# Altium PCB NanoD1.PcbDoc (part 1 of 2)
Units mm, origin at the board's own origin, x right, y up, seen from the top; angles counter-clockwise.
Board outline 66 x 38 mm, 4 copper layers (Top Layer, GND, POWER, Bottom Layer), stack 1.598 mm thick; 143 components, 106 nets, 507 pads, 211 vias.
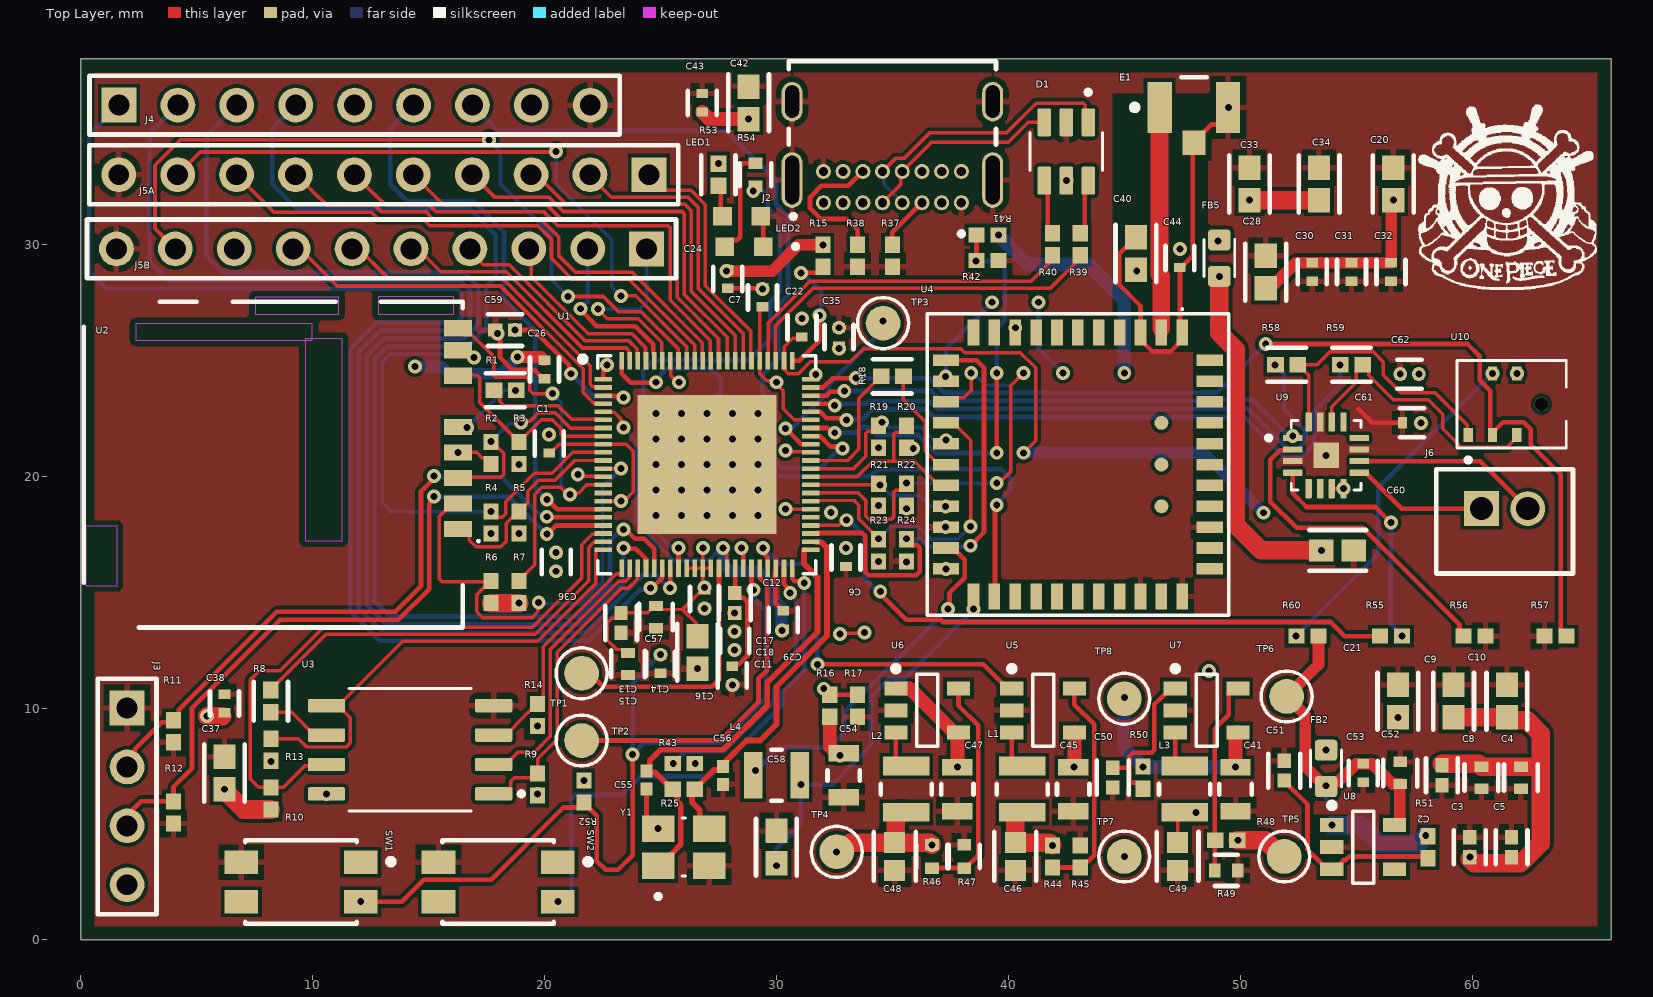
[diagram p0: Top Layer view]
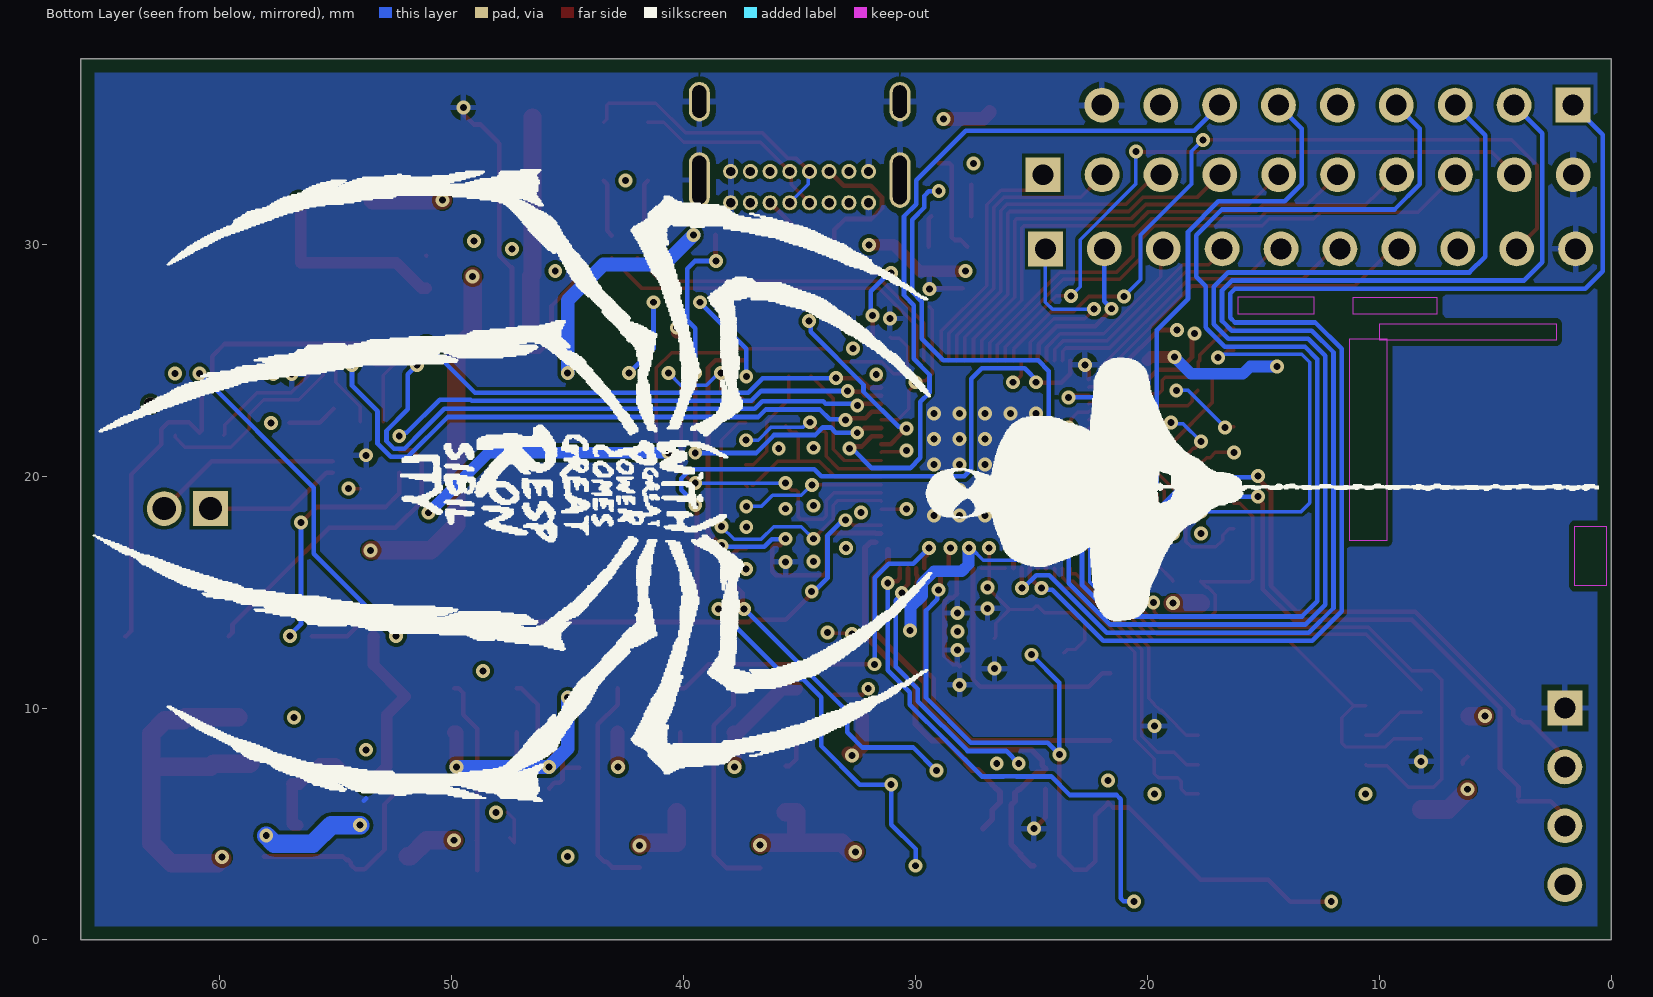
[diagram p1: Bottom Layer view, seen from below]
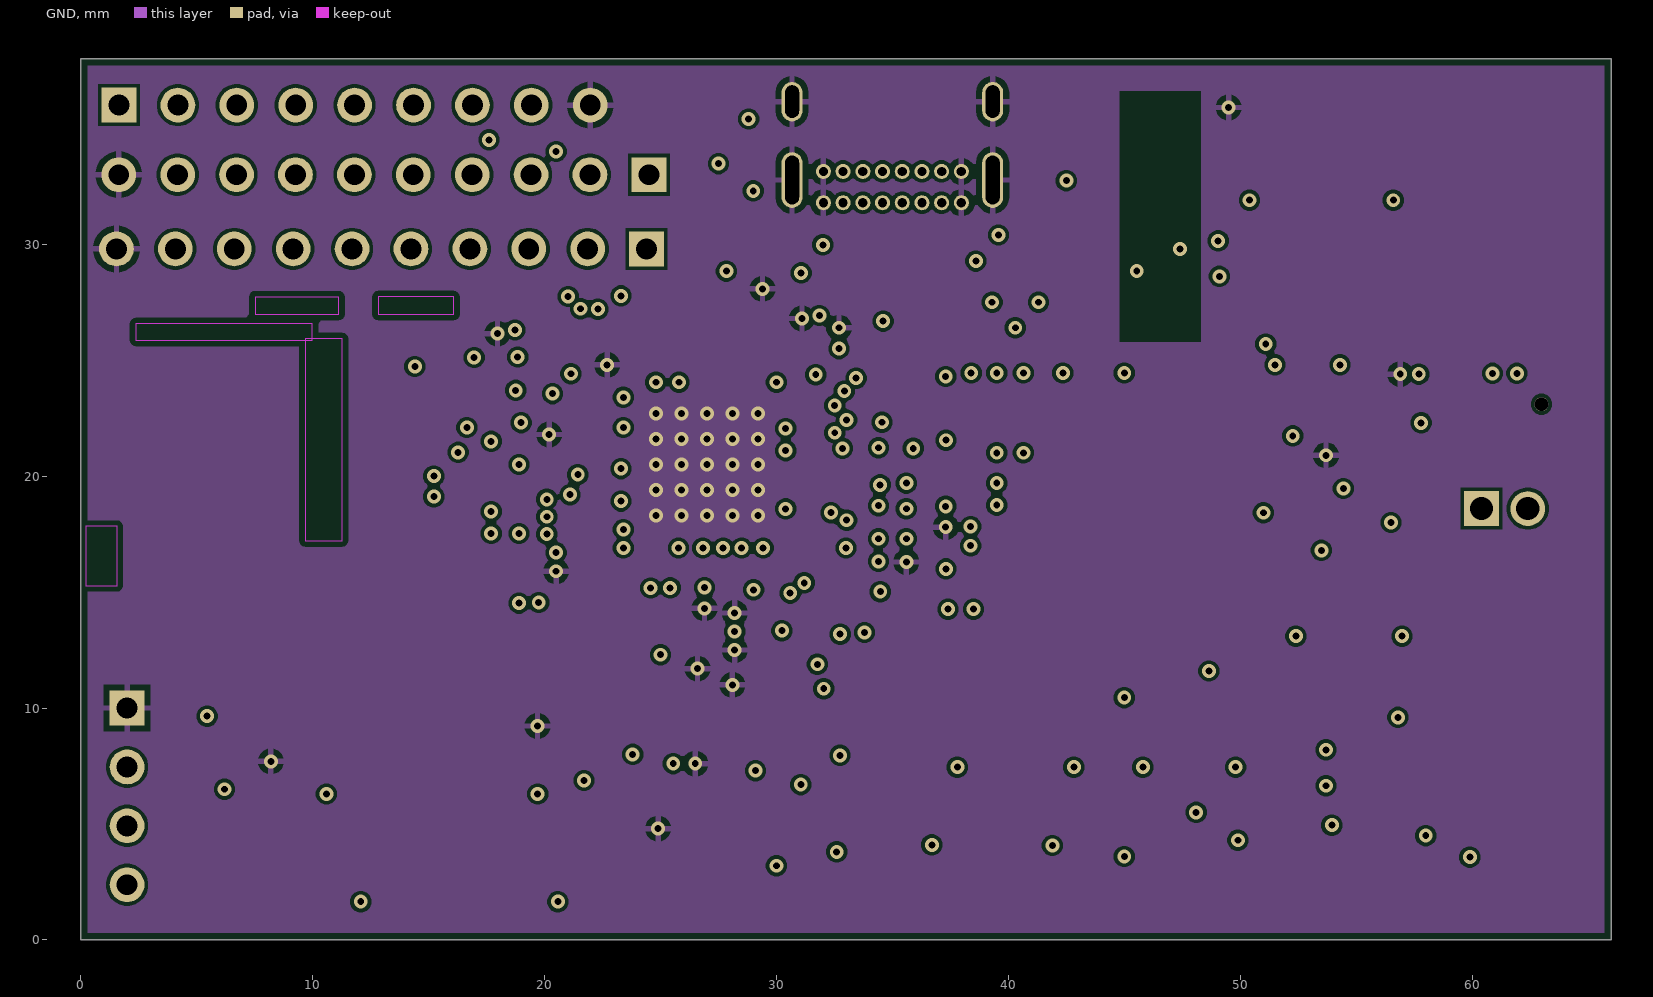
[diagram p2: GND]
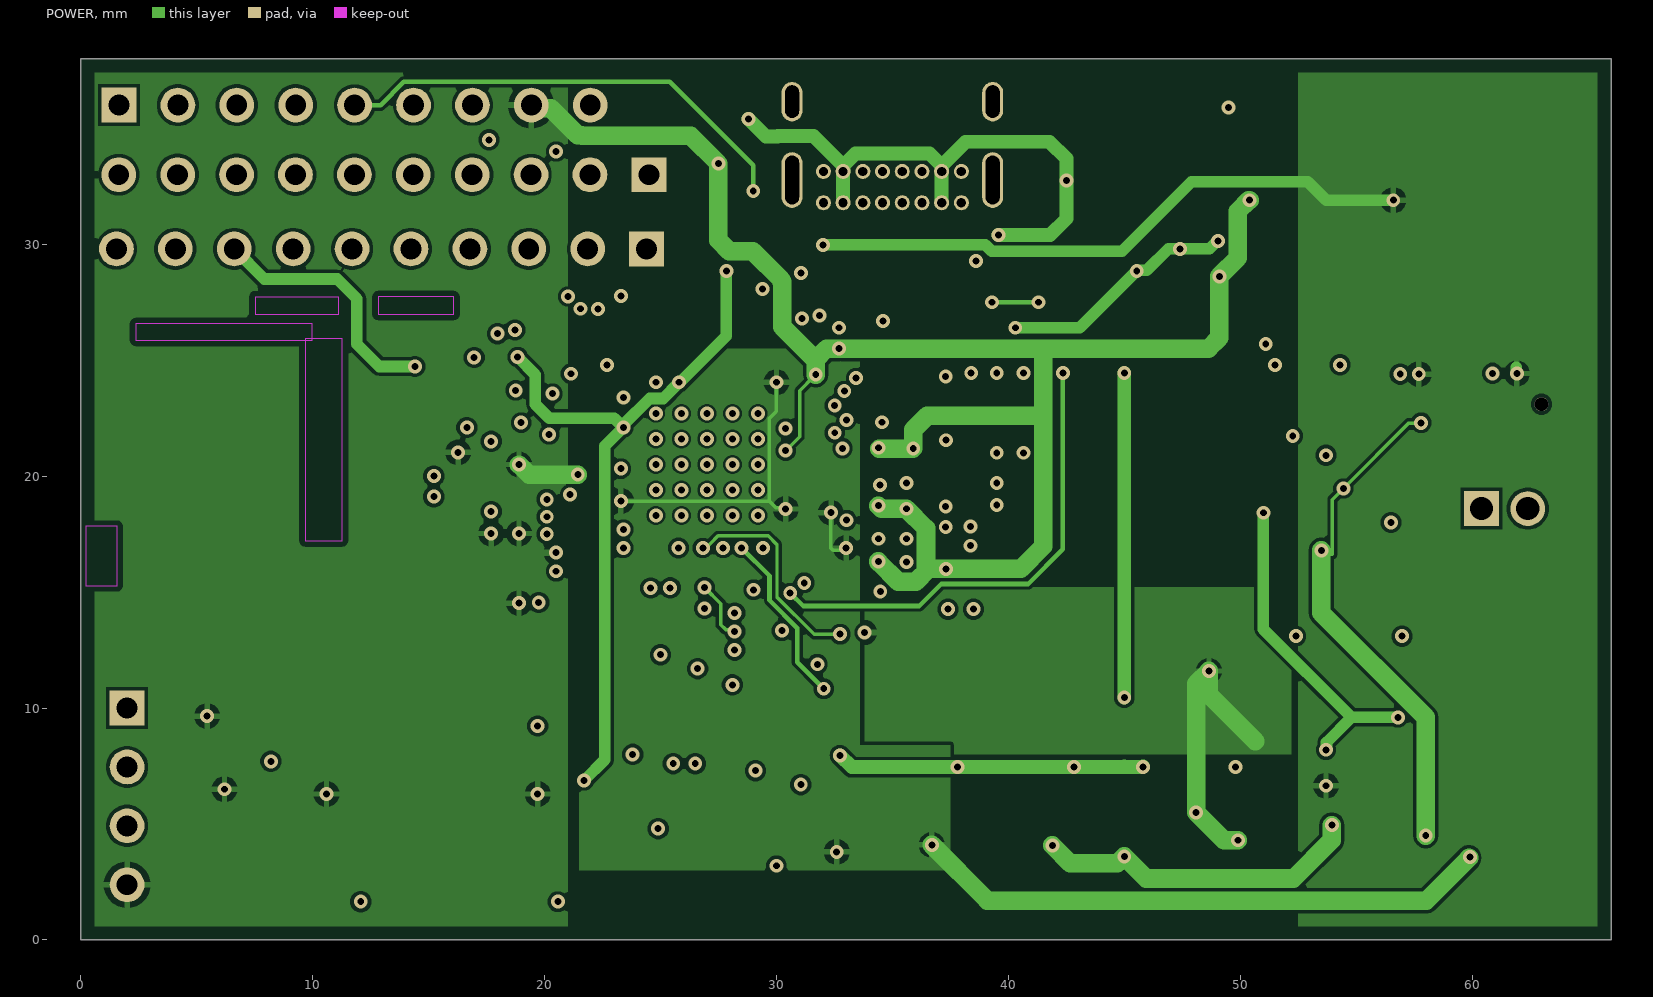
[diagram p3: POWER]
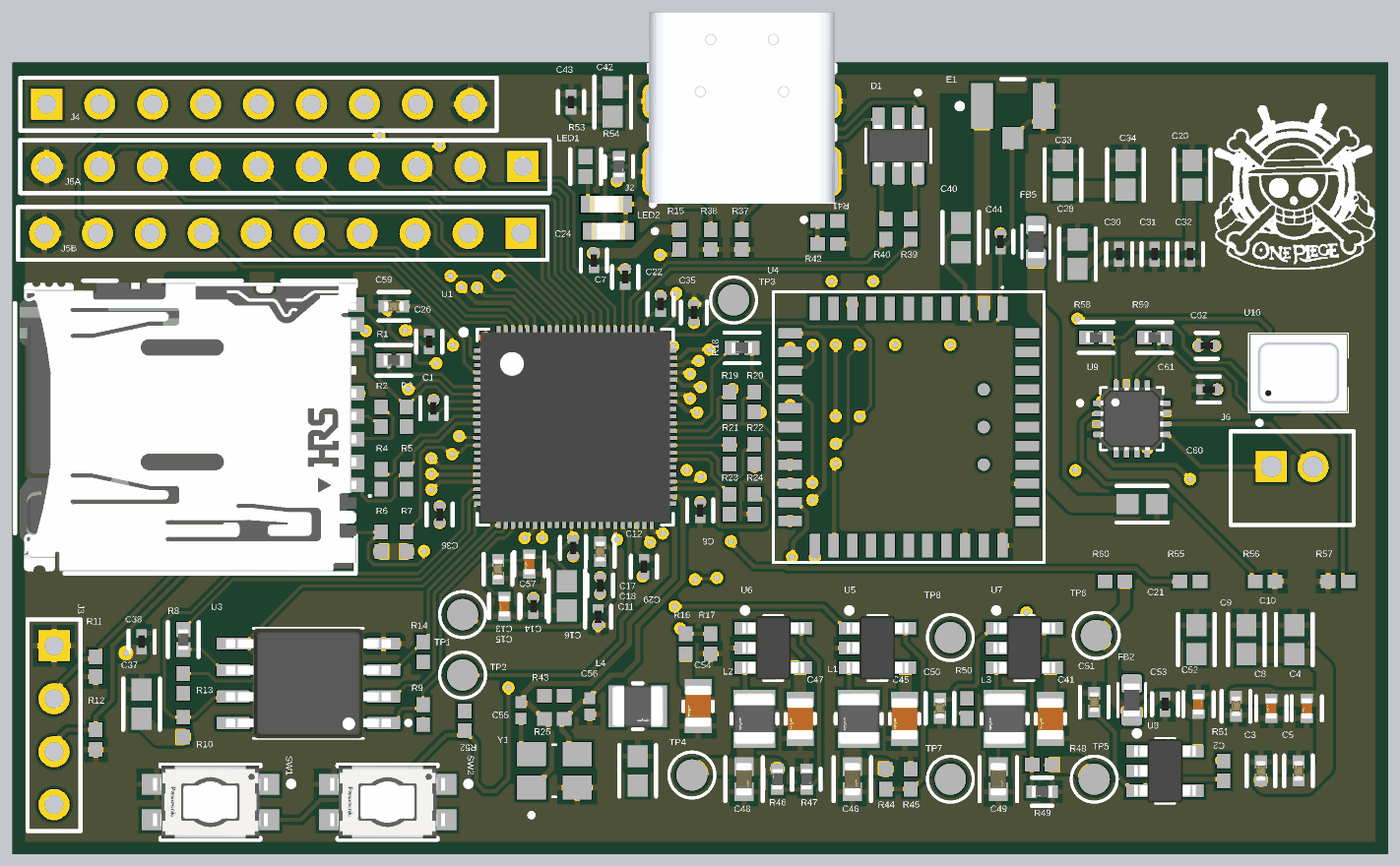
[diagram p5: 3D render of the assembled board from above, using the file's embedded part models]

## Layer stack, top to bottom
Top Solder: solder mask 0.0203, SM-001, Dk 3.8
Top Layer: signal copper 0.035
Dielectric 1: prepreg 0.1164, PP-016, Dk 4.16
GND: signal copper 0.0152
Dielectric 2: core 1.265, Core-043, Dk 4.6
POWER: signal copper 0.0152
Dielectric 3: prepreg 0.1164, PP-016, Dk 4.16
Bottom Layer: signal copper 0.035
Bottom Solder: solder mask 0.0203, SM-001, Dk 3.8

## Board outline
0,0 0,38 66,38 66,0

## Design rules (kind name [scope] priority, off if disabled: settings)
AssemblyTestPointUsage [All] p1: isadvanced=TRUE
AssemblyTestpoint [All] p1: isadvanced=TRUE testpointundercomponent=TRUE minsize=1.016 maxsize=2.54 preferedsize=1.524 minholesize=0 maxholesize=1.016 preferedholesize=0.813 testpointgrid=0.025 usegrid=TRUE gridtolerance=0 allowsidetop=TRUE allowsidebottom=TRUE
Clearance Clearance_QFN [InComponent('U1')] p1: isadvanced=TRUE gap=0.1 ignorepadtopadclearanceinfootprint=FALSE
Clearance Clearance_1 [(ExistsOnLayer('GND') Or ExistsOnLayer('POWER')) vs (ExistsOnLayer('GND') Or ExistsOnLayer('POWER'))] p2: gap=0.15 ignorepadtopadclearanceinfootprint=FALSE sourcerule=69 cellrowname=All cellrowtype=0 cellcolname=All cellcoltype=0 innerlayers=TRUE
Clearance Clearance_2 [(ExistsOnLayer('Top Layer') Or ExistsOnLayer('Bottom Layer')) vs (ExistsOnLayer('Top Layer') Or ExistsOnLayer('Bottom Layer'))] p3: gap=0.15 ignorepadtopadclearanceinfootprint=FALSE sourcerule=69 cellrowname=All cellrowtype=0 cellcolname=All cellcoltype=0 outerlayers=TRUE
Clearance [All] p4: gap=0.254 ignorepadtopadclearanceinfootprint=FALSE ismatrix=TRUE
ComponentClearance [All] p1: isadvanced=TRUE gap=0.254 collisioncheckmode=3 verticalgap=0.254 showdistances=FALSE
DiffPairsRouting Diff_USB_SOC [InDifferentialPair('USB_SOC')] p1: isadvanced=TRUE maxlimit=0.25 minlimit=0.15 mostfreqgap=0.187 toplayer_minwidth=0.13 toplayer_maxwidth=0.2 toplayer_prefwidth=0.155 midlayer1_minwidth=0.13 midlayer1_maxwidth=0.2 midlayer1_prefwidth=0.155 midlayer2_minwidth=0.13 midlayer2_maxwidth=0.2 midlayer2_prefwidth=0.155 bottomlayer_minwidth=0.13 bottomlayer_maxwidth=0.2 bottomlayer_prefwidth=0.155 maxuncoupledlength=12.7
DiffPairsRouting Diff_USB_MID [InDifferentialPair('USB_MID')] p2: isadvanced=TRUE maxlimit=0.65 minlimit=0.6 mostfreqgap=0.616 toplayer_minwidth=0.2 toplayer_maxwidth=0.25 toplayer_prefwidth=0.203 midlayer1_minwidth=0.2 midlayer1_maxwidth=0.25 midlayer1_prefwidth=0.203 midlayer2_minwidth=0.2 midlayer2_maxwidth=0.25 midlayer2_prefwidth=0.203 bottomlayer_minwidth=0.2 bottomlayer_maxwidth=0.25 bottomlayer_prefwidth=0.203 maxuncoupledlength=12.7
DiffPairsRouting Diff_USB_CON [InDifferentialPair('USB_CON')] p3: isadvanced=TRUE maxlimit=0.25 minlimit=0.15 mostfreqgap=0.187 toplayer_minwidth=0.13 toplayer_maxwidth=0.2 toplayer_prefwidth=0.155 midlayer1_minwidth=0.13 midlayer1_maxwidth=0.2 midlayer1_prefwidth=0.155 midlayer2_minwidth=0.13 midlayer2_maxwidth=0.2 midlayer2_prefwidth=0.155 bottomlayer_minwidth=0.13 bottomlayer_maxwidth=0.2 bottomlayer_prefwidth=0.155 maxuncoupledlength=12.7
DiffPairsRouting DifferentialPairsRouting_1 [InDifferentialPair('USB_SOC')] p4 off: maxlimit=0.254 minlimit=0.127 mostfreqgap=0.254 toplayer_maxgap=0.127 toplayer_prefgap=0.127 toplayer_minwidth=0.155 toplayer_maxwidth=0.155 toplayer_prefwidth=0.14 bottomlayer_maxgap=0.127 bottomlayer_prefgap=0.127 bottomlayer_minwidth=0.155 bottomlayer_maxwidth=0.155 bottomlayer_prefwidth=0.14 impedanceprofiledriven=TRUE impedanceprofileid={6FF959FB-8391-4CED-8F7A-5CF215E27A95} impedanceprofilevalue=90.000000 maxuncoupledlength=12.7
DiffPairsRouting DifferentialPairsRouting_2 [InDifferentialPair('USB_MID')] p5 off: maxlimit=0.254 minlimit=0.127 mostfreqgap=0.254 toplayer_maxgap=0.127 toplayer_prefgap=0.127 toplayer_minwidth=0.155 toplayer_maxwidth=0.155 toplayer_prefwidth=0.14 bottomlayer_maxgap=0.127 bottomlayer_prefgap=0.127 bottomlayer_minwidth=0.155 bottomlayer_maxwidth=0.155 bottomlayer_prefwidth=0.14 impedanceprofiledriven=TRUE impedanceprofileid={6FF959FB-8391-4CED-8F7A-5CF215E27A95} impedanceprofilevalue=90.000000 maxuncoupledlength=12.7
DiffPairsRouting DifferentialPairsRouting_3 [InDifferentialPair('USB_CON')] p6 off: maxlimit=0.254 minlimit=0.127 mostfreqgap=0.254 toplayer_maxgap=0.127 toplayer_prefgap=0.127 toplayer_minwidth=0.155 toplayer_maxwidth=0.155 toplayer_prefwidth=0.14 bottomlayer_maxgap=0.127 bottomlayer_prefgap=0.127 bottomlayer_minwidth=0.155 bottomlayer_maxwidth=0.155 bottomlayer_prefwidth=0.14 impedanceprofiledriven=TRUE impedanceprofileid={6FF959FB-8391-4CED-8F7A-5CF215E27A95} impedanceprofilevalue=90.000000 maxuncoupledlength=12.7
DiffPairsRouting [All] p7: maxlimit=0.254 minlimit=0.254 mostfreqgap=0.254 toplayer_minwidth=0.381 toplayer_maxwidth=0.381 toplayer_prefwidth=0.381 midlayer1_minwidth=0.381 midlayer1_maxwidth=0.381 midlayer1_prefwidth=0.381 midlayer2_minwidth=0.381 midlayer2_maxwidth=0.381 midlayer2_prefwidth=0.381 bottomlayer_minwidth=0.381 bottomlayer_maxwidth=0.381 bottomlayer_prefwidth=0.381 maxuncoupledlength=12.7
FabricationTestPointUsage [All] p1: isadvanced=TRUE valid=0 allowmultiple=FALSE
FabricationTestpoint [All] p1: isadvanced=TRUE side=3 testpointundercomponent=TRUE minsize=1.016 maxsize=2.54 preferedsize=1.524 minholesize=0 maxholesize=1.016 preferedholesize=0.813 testpointgrid=0.025 allowsidetop=TRUE allowsidebottom=TRUE usegrid=TRUE gridtolerance=0
FanoutControl Fanout_BGA [IsBGA] p1: isadvanced=TRUE bgadir=Out bgaviamode=Centered fanoutstyle=Auto fanoutdirection=Alternating viagrid=0.025 // Fanout_BGA (Default Rule)
FanoutControl Fanout_LCC [IsLCC] p2: isadvanced=TRUE bgadir=Out bgaviamode=Centered fanoutstyle=Auto fanoutdirection=Alternating viagrid=0.025 // Fanout_LCC (Default Rule)
FanoutControl Fanout_SOIC [IsSOIC] p3: isadvanced=TRUE bgadir=Out bgaviamode=Centered fanoutstyle=Auto fanoutdirection=Alternating viagrid=0.025 // Fanout_SOIC (Default Rule)
FanoutControl Fanout_Small [(CompPinCount < 5)] p4: isadvanced=TRUE bgadir=Out bgaviamode=Centered fanoutstyle=Auto fanoutdirection=OutThenIn viagrid=0.025 // Fanout_Small (Default Rule)
FanoutControl Fanout_Default [All] p5: isadvanced=TRUE bgadir=Out bgaviamode=Centered fanoutstyle=Auto fanoutdirection=Alternating viagrid=0.025 // Fanout_Default (Default Rule)
Height [All] p1: isadvanced=TRUE minheight=0 maxheight=25.4 prefheight=12.7
HoleSize [All] p1: isadvanced=TRUE absolutevalues=TRUE maxlimit=3.5 minlimit=0.25 maxpercent=80.000 minpercent=20.000
HoleToHoleClearance [All] p1: isadvanced=TRUE gap=0.254 allowstackedmicrovias=TRUE
LayerPairs [All] p1: isadvanced=TRUE enforce=TRUE
MinimumAnnularRing [All] p1: isadvanced=TRUE minimumring=0.12
MinimumSolderMaskSliver [All] p1: isadvanced=TRUE minsoldermaskwidth=0.05
NetAntennae [All] p1: isadvanced=TRUE netantennaetolerance=0
PasteMaskExpansion [All] p1: isadvanced=TRUE expansion=0
PlaneClearance [All] p1: isadvanced=TRUE clearance=0.508
PlaneConnect [All] p1: isadvanced=TRUE planeconnectstyle=Relief reliefexpansion=0.508 reliefentries=4 reliefconductorwidth=0.254 reliefairgap=0.254
PolygonConnect PolyConnect_Thermal [InComponent('U1') Or InComponent('U9')] p1: isadvanced=TRUE connectstyle=Direct reliefconductorwidth=0.254 reliefentries=2 polygonreliefangle="45 Angle" airgapwidth=0.254
PolygonConnect [All] p2: connectstyle=Relief reliefconductorwidth=0.25 reliefentries=4 polygonreliefangle="90 Angle" airgapwidth=0.25
RoutingCorners [All] p1: isadvanced=TRUE cornerstyle=45-Degree minsetback=2.54 maxsetback=2.54
RoutingPriority [All] p1: isadvanced=TRUE routingpriority=0
RoutingVias [All] p1: holewidth=0.3 width=0.6 viastyle="Through Hole" minholewidth=0.3 minwidth=0.6 maxholewidth=0.3 maxwidth=0.6
ShortCircuit [All] p1: isadvanced=TRUE allowed=FALSE
SilkToSilkClearance [All] p1: isadvanced=TRUE silktosilkclearance=0.15
SilkToSolderMaskClearance [IsPad] p1: isadvanced=TRUE minsilkscreentomaskgap=0.1 clearancetoexposedcopper=TRUE
SolderMaskExpansion [All] p1: isadvanced=TRUE expansion=0.05 istentingtop=FALSE
SupplyNets "Schematic Supply Nets_15" [InNet('VDD3V3')] p1: isadvanced=TRUE voltage=0.000
SupplyNets "Schematic Supply Nets_13" [InNet('UART0_TX')] p2: isadvanced=TRUE voltage=0.000
SupplyNets "Schematic Supply Nets_12" [InNet('LPO')] p3: isadvanced=TRUE voltage=0.000
SupplyNets "Schematic Supply Nets_11" [InNet('VBUS_5V')] p4: isadvanced=TRUE voltage=0.000
SupplyNets "Schematic Supply Nets_10" [InNet('WL_LDO_IN')] p5: isadvanced=TRUE voltage=0.000
SupplyNets "Schematic Supply Nets_9" [InNet('VBAT_DET')] p6: isadvanced=TRUE voltage=0.000
SupplyNets "Schematic Supply Nets_8" [InNet('WIFI_VDD')] p7: isadvanced=TRUE voltage=0.000
SupplyNets "Schematic Supply Nets_7" [InNet('VDD18A_USB')] p8: isadvanced=TRUE voltage=0.000
SupplyNets "Schematic Supply Nets_6" [InNet('VDD1V35')] p9: isadvanced=TRUE voltage=0.000
SupplyNets "Schematic Supply Nets_5" [InNet('PWR_SEQ2')] p10: isadvanced=TRUE voltage=0.000
SupplyNets "Schematic Supply Nets_4" [InNet('GND')] p11: isadvanced=TRUE voltage=0.000
SupplyNets "Schematic Supply Nets_3" [InNet('VDDC')] p12: isadvanced=TRUE voltage=0.000
SupplyNets "Schematic Supply Nets_2" [InNet('VDDC_RTC')] p13: isadvanced=TRUE voltage=0.000
SupplyNets "Schematic Supply Nets_1" [InNet('VDD1V8')] p14: isadvanced=TRUE voltage=0.000
SupplyNets "Schematic Supply Nets" [InNet('UART0_RX')] p15: isadvanced=TRUE voltage=0.000
UnRoutedNet [All] p1: isadvanced=TRUE
UnpouredPolygon [All] p1: isadvanced=TRUE
Width MaxMinWidth_1 [InNetClass('PWR_CORE')] p1: maxlimit=3 minlimit=0.15 preferedwidth=1.5 minimp=50.000000 maximp=50.000000 favimp=50.000000
Width MaxMinWidth_2 [InNetClass('PWR_1V35')] p2: maxlimit=3 minlimit=0.15 preferedwidth=1.5 minimp=50.000000 maximp=50.000000 favimp=50.000000
Width MaxMinWidth_3 [InNetClass('PWR_3V3')] p3: maxlimit=3 minlimit=0.15 preferedwidth=0.8 minimp=50.000000 maximp=50.000000 favimp=50.000000
Width MaxMinWidth_4 [InNetClass('PWR_1V8')] p4: maxlimit=2 minlimit=0.15 preferedwidth=0.5 minimp=50.000000 maximp=50.000000 favimp=50.000000
Width MaxMinWidth_5 [InNetClass('PWR_5V')] p5: maxlimit=2 minlimit=0.15 preferedwidth=0.8 minimp=50.000000 maximp=50.000000 favimp=50.000000
Width MaxMinWidth_6 [InNetClass('SDIO')] p6: maxlimit=0.3 minlimit=0.1 preferedwidth=0.15 minimp=50.000000 maximp=50.000000 favimp=50.000000
Width MaxMinWidth_7 [InNetClass('SPINOR')] p7: maxlimit=0.3 minlimit=0.1 preferedwidth=0.15 minimp=50.000000 maximp=50.000000 favimp=50.000000
Width MaxMinWidth_8 [InNetClass('XTAL')] p8: maxlimit=0.25 minlimit=0.25 preferedwidth=0.25 minimp=50.000000 maximp=50.000000 favimp=50.000000
Width MaxMinWidth_9 [InNetClass('RF')] p9: maxlimit=0.762 minlimit=0.762 preferedwidth=0.762 minimp=50.000000 maximp=50.000000 favimp=50.000000
Width [All] p10: maxlimit=2 minlimit=0.15 preferedwidth=0.2 minimp=50.000000 maximp=50.000000 favimp=50.000000
3 further rules are at their usual default settings.

## Classes and differential pairs
component class NanoD1_Audio: C60 C61 C62 J6 R55 R56 R57 R58 R59 R60 U9 U10
net class RF: WIFI_ANT
net class XTAL: XTAL_XIN XTAL_XOUT
net class SPINOR: SPI_CLK SPI_CLK_F SPI_CS SPI_HOLD SPI_MISO SPI_MOSI SPI_WP
net class SDIO: SD0_CD SD0_CLK SD0_CLK_SD SD0_CMD SD0_D0 SD0_D1 SD0_D2 SD0_D3 SD1_CLK SD1_CLK_W SD1_CMD SD1_D0 SD1_D1 SD1_D2 SD1_D3
net class PWR_5V: VBUS_5V
net class PWR_1V35: VDD1V35
net class PWR_1V8: VDD1V8 VDD18A_USB WIFI_VDD
net class PWR_3V3: VDD3V3
net class PWR_CORE: VDDC
component class NanoD1_Wireless: C40 C44 C58 E1 FB5 L4 R18 R19 R20 R21 R22 R23 R24 R25 U4
component class NanoD1_USB: C42 C43 D1 J2 R37 R38 R39 R40 R41 R42
component class NanoD1_Storage: C37 C38 R1 R2 R3 R4 R5 R6 R7 R8 R9 R10 R11 R12 R13 R14 U2 U3
component class NanoD1_Power: C17 C18 C21 C22 C41 C45 C46 C47 C48 C49 C50 C51 C52 C53 C54 FB2 L1 L2 L3 R16 R17 R44 R45 R46 R47 R48 R49 R50 R51 TP4 TP5 TP6 TP7 TP8 U5 U6 U7 U8
component class NanoD1_IO: C59 J3 J4 J5A J5B LED1 LED2 R53 R54
component class NanoD1_Decoupling: C1 C2 C3 C4 C5 C6 C7 C8 C9 C10 C11 C12 C13 C14 C15 C16 C20 C24 C26 C28 C29 C30 C31 C32 C33 C34 C35 C36
component class NanoD1_Clk_Reset: C55 C56 C57 R15 R43 R52 SW1 SW2 TP1 TP2 TP3 U1 Y1
differential pair USB_CON: +USB_DP_CON -USB_DM_CON
differential pair USB_MID: +USB_DP_MID -USB_DM_MID
differential pair USB_SOC: +USB_DP -USB_DM

## Components (designator, comment, footprint, x,y, rotation, side; value= is the part's Value field where it differs from the comment)
C1 "100nF" FP-GRM15-MFG 20.2,21.4 r270 top value=0.10μF
C2 "1uF" FP-GRM15-0_1-IPC_B 58.7,7.1 r270 top
C3 "1uF" FP-GRM15-0_1-IPC_B 59.9,4 r90 top
C4 "4.7uF" FP-GRM155-0_15-MFG 62.1,7 r270 top
C5 "1uF" FP-GRM15-0_1-IPC_B 61.7,4 r90 top
C6 "100nF" FP-GRM15-MFG 33,16.5 r90 top value=0.10μF
C7 "100nF" FP-GRM15-MFG 29.4,27.7 r270 top value=0.10μF
C8 "4.7uF" FP-GRM155-0_15-MFG 60.4,7 r270 top
C9 "10uF" FP-GRM188-0_15-IPC_B 59.2,10.3 r90 top
C10 "10uF" FP-GRM188-0_15-IPC_B 61.5,10.3 r90 top
C11 "100nF" FP-GRM15-MFG 26.9,14.7 r90 top value=0.10μF
C12 "100nF" FP-GRM15-MFG 28.2,12.9 r90 top value=0.10μF
C13 "1uF" FP-GRM15-0_1-IPC_B 23.3,13.671 r270 top
C14 "4.7uF" FP-GRM155-0_15-MFG 24.8,13.925 r270 top
C15 "4.7uF" FP-GRM155-0_15-MFG 23.6,11.9 r270 top
C16 "10uF" FP-GRM188-0_15-IPC_B 26.6,12.399 r270 top
C17 "1uF" FP-GRM15-0_1-IPC_B 28.2,14.529 r270 top
C18 "100nF" FP-GRM15-MFG 28.1,11.4 r90 top value=0.10μF
C20 "10uF" FP-GRM188-0_15-IPC_B 56.6,32.6 r90 top
C21 "10uF" FP-GRM188-0_15-IPC_B 56.8,10.3 r90 top
C22 "100nF" FP-GRM15-MFG 31.1,26.4 r270 top value=0.10μF
C24 "100nF" FP-GRM15-MFG 27.9,28.5 r90 top value=0.10μF
C26 "100nF" FP-GRM15-MFG 20,24.6 r90 top value=0.10μF
C28 "10uF" FP-GRM188-0_15-IPC_B 51.1,28.8 r90 top
C29 "100nF" FP-GRM15-MFG 30.3,13.8 r270 top value=0.10μF
C30 "100nF" FP-GRM15-MFG 53.1,28.8 r90 top value=0.10μF
C31 "100nF" FP-GRM15-MFG 54.8,28.8 r90 top value=0.10μF
C32 "100nF" FP-GRM15-MFG 56.5,28.8 r90 top value=0.10μF
C33 "10uF" FP-GRM188-0_15-IPC_B 50.4,32.6 r90 top
C34 "10uF" FP-GRM188-0_15-IPC_B 53.4,32.6 r90 top
C35 "100nF" FP-GRM15-MFG 32.7,26 r270 top value=0.10μF
C36 "100nF" FP-GRM15-MFG 20.5,16.3 r90 top value=0.10μF
C37 "10uF" FP-GRM188-0_15-IPC_B 6.2,7.2 r90 top
C38 "100nF" FP-GRM15-MFG 6.2,10.2 r270 top value=0.10μF
C40 "10uF" FP-GRM188-0_15-IPC_B 45.5,29.6 r90 top
C41 "22uF" FP-GRM21B-0_15-MFG 49.8,6.5 r270 top
C42 "10uF" FP-GRM188-0_15-IPC_B 28.8,36.1 r90 top
C43 "100nF" FP-GRM15-MFG 26.8,36.1 r90 top value=0.10μF
C44 "100nF" FP-GRM15-MFG 47.4,29.4 r90 top value=0.10μF
C45 "22uF" FP-GRM21B-0_15-MFG 42.8,6.5 r270 top
C46 "22uF" FP-GRM188-0_2-IPC_C 40.3,3.6 r270 top
C47 "22uF" FP-GRM21B-0_15-MFG 37.8,6.5 r270 top
C48 "22uF" FP-GRM188-0_2-IPC_C 35.1,3.6 r270 top
C49 "22uF" FP-GRM188-0_2-IPC_C 47.3,3.6 r270 top
C50 "1uF" FP-GRM15-0_1-IPC_B 44.5,7 r270 top
C51 "1uF" FP-GRM15-0_1-IPC_B 51.9,7.3 r90 top
C52 "4.7uF" FP-GRM155-0_15-MFG 56.9,7.2 r90 top
C53 "100nF" FP-GRM15-MFG 55.3,7.2 r90 top value=0.10μF
C54 "22uF" FP-GRM21B-0_15-MFG 32.9,7.1 r270 top
C55 "18pF" CAPC1005X55X25LL05T10 24.4,6.9 r90 top
C56 "18pF" CAPC1005X55X25LL05T10 27.7,7.1 r90 top
C57 "100nF" FP-GRM15-MFG 25,11.9 r90 top value=0.10μF
C58 "10uF" FP-GRM188-0_15-IPC_B 30,4 r90 top
C59 "1uF" FP-GRM15-0_1-IPC_B 18.3,26.3 r180 top
C60 "10uF" FP-GRM188-0_15-IPC_B 54.2,16.8 r0 top
C61 "100nF" FP-GRM15-MFG 57.4,22.3 r0 top value=0.10μF
C62 "100nF" FP-GRM15-MFG 57.3,24.4 r0 top value=0.10μF
D1 "USBLC6-2SC6" SOT95P280X145-6N 42.5,34 r270 top
E1 "U.FL-R-SMT-1(01)" HRS-U.FL-R-SMT-3_V 48,35.9 r0 top
FB2 "600R@100MHz" INDC1608X95N 53.7,7.4 r90 top
FB5 "600R@100MHz" INDC1608X95N 49.1,29.4 r90 top
J2 "USB4085-GF-A_REVA4" GCT_USB4085-GF-A_REVA4 35,36.15 r180 top
J3 "Header 4" HDR1X4 2,10 r270 top
J4 "Header 9" HDR1X9 1.65,36 r0 top
J5A "Header 10" HDR1X10 24.5,33 r180 top
J5B "Header 10" HDR1X10 24.4,29.8 r180 top
J6 "B2B-PH-K-S(LF)(SN)" JST-B2B-PH-K-S_V 61.4,18.05 r0 top
L1 "2.2uH 2A" FP-DFE252010C-MFG 40.6,6.5 r270 top
L2 "1.0uH 4A" FP-DFE252010C-MFG 35.6,6.5 r270 top value="1uH 4A"
L3 "2.2uH 2A" FP-DFE252010C-MFG 47.6,6.5 r270 top
L4 "4.7uH" FP-DFE252010C-MFG 30,7.1 r0 top
LED1 "KP-1608SGC" LED_KP-1608SGC 28.5,31.2 r180 top
LED2 "KP-1608SGC" LED_KP-1608SGC 28.6,29.9 r180 top
R1 "22R" FP-RC0402-0_4-IPC_A 18.3,23.7 r180 top
R2 "10K" RESC1005X40X25ML05T10 17.7,21 r90 top
R3 "10K" RESC1005X40X25ML05T10 18.9,21 r90 top
R4 "10K" RESC1005X40X25ML05T10 17.7,18 r90 top
R5 "10K" RESC1005X40X25ML05T10 18.9,18 r90 top
R6 "10K" RESC1005X40X25ML05T10 17.7,15 r90 top
R7 "10K 1%" RESC1005X40X25ML05T10 18.9,15 r90 top
R8 "22R" FP-RC0402-0_4-IPC_A 8.2,10.3 r90 top
R9 "4.7K" RESC1005X40X25ML05T10 19.7,6.7 r90 top
R10 "4.7K" RESC1005X40X25ML05T10 8.2,6.1 r90 top
R11 "4.7K" RESC1005X40X25ML05T10 4,9 r90 top
R12 "4.7K" RESC1005X40X25ML05T10 4,5.5 r90 top
R13 "4.7K" RESC1005X40X25ML05T10 8.2,8.2 r90 top
R14 "4.7K" RESC1005X40X25ML05T10 19.7,9.7 r90 top
R15 "4.7K" RESC1005X40X25ML05T10 32,29.5 r90 top
R16 "30K 1%" RESC1005X40X25ML05T10 32.3,10.1 r270 top
R17 "10K 1%" RESC1005X40X25ML05T10 33.5,10.1 r90 top
R18 "22R" FP-RC0402-0_4-IPC_A 35,24.3 r180 top
R19 "10K" RESC1005X40X25ML05T10 34.4,21.7 r90 top
R20 "10K" RESC1005X40X25ML05T10 35.6,21.7 r90 top
R21 "10K" RESC1005X40X25ML05T10 34.4,19.2 r90 top
R22 "10K" RESC1005X40X25ML05T10 35.6,19.2 r90 top
R23 "10K" RESC1005X40X25ML05T10 34.4,16.8 r90 top
R24 "10K" RESC1005X40X25ML05T10 35.6,16.8 r90 top
R25 "10K" RESC1005X40X25ML05T10 26,7.6 r180 top
R37 "5K1" RESC1005X40X25ML05T10 35,29.5 r90 top
R38 "5K1" RESC1005X40X25ML05T10 33.5,29.5 r90 top
R39 "5R1" RESC1005X40X25ML05T10 43.1,30 r90 top
R40 "5R1" RESC1005X40X25ML05T10 41.9,30 r90 top
R41 "100K" RESC1005X40X25ML05T10 39.1,30.4 r0 top
R42 "47K" RESC1005X40X25ML05T10 39.1,29.3 r180 top
R43 "1M" RESC1005X40X25ML05T10 26,6.5 r180 top
R44 "100K 1%" RESC1005X40X25ML05T10 41.9,3.6 r90 top
R45 "22K6 1%" RESC1005X40X25ML05T10 43.1,3.6 r270 top
R46 "11K8 1%" FP-RC0402-0_4-MFG 36.7,3.6 r90 top
R47 "20K 1%" FP-RC0402-0_4-MFG 38.1,3.6 r270 top
R48 "15K 1%" RESC1005X40X25ML05T10 49.4,4.3 r0 top
R49 "12K 1%" FP-RC0402-0_4-MFG 49.4,3 r180 top
R50 "33K" RESC1005X40X25ML05T10 45.8,7 r90 top
R51 "33K" RESC1005X40X25ML05T10 58.1,4 r90 top
R52 "10K" RESC1005X40X25ML05T10 21.7,6.4 r270 top
R53 "2K" FP-RC_L0402-IPC_A 27.5,33 r90 top value=2kΩ
R54 "1K" FP-RC0402-0_4-MFG 29.1,33 r270 top
R55 "300K" RESC1005X40X25ML05T10 56.5,13.1 r0 top
R56 "100K" RESC1005X40X25ML05T10 60.1,13.1 r0 top
R57 "100K" RESC1005X40X25ML05T10 63.6,13.1 r0 top
R58 "22R" FP-RC0402-0_4-IPC_A 52,24.8 r0 top
R59 "22R" FP-RC0402-0_4-IPC_A 54.8,24.8 r0 top
R60 "0R" RESC1005X40X25ML05T10 52.9,13.1 r0 top
SW1 "Reset" FP-EVQ-P2002M-MFG 9.5,2.5 r270 top
SW2 "Boot" FP-EVQ-P2002M-MFG 18,2.5 r270 top
TP1 "TP" TP-1.5MM 21.6,11.5 r0 top
TP2 "TP" TP-1.5MM 21.6,8.6 r0 top
TP3 "TP" TP-1.5MM 34.6,26.6 r0 top
TP4 "TP" TP-1.5MM 32.6,3.8 r0 top
TP5 "TP" TP-1.5MM 51.9,3.6 r0 top
TP6 "TP" TP-1.5MM 52,10.5 r0 top
TP7 "TP" TP-1.5MM 45,3.6 r0 top
TP8 "TP" TP-1.5MM 45,10.4 r0 top
U1 "SG2002" QFN88-9x9-0.35 27,20.5 r0 top
U2 "DM3AT-SF-PEJM5(40)" FP-DM3AT-SF-PEJM5_40-MFG 8.3,20.5 r270 top
U3 "W25Q128JVSIM_TR" SOIC127P790X216-8N 14.2,8.2 r180 top
U4 "AP6212" AP6212-12X12 43,20.5 r270 top
U5 "ETA3414S2F" SOT23-5 41.5,9.9 r0 top
U6 "ETA3414S2F" SOT23-5 36.5,9.9 r0 top
U7 "ETA3414S2F" SOT23-5 48.55,9.9 r0 top
U8 "ETA5050V18S2F" SOT23-5 55.3,4 r0 top
U9 "MAX98357AETE+T" QFN50P300X300X80-17N 53.7,20.9 r0 top
U10 "INMP441ACEZ-R7" MIC_INMP441ACEZ-R7 61.7,23.1 r180 top
Y1 "TSX-3225_25.0000MF20X-W" XTAL_TSX-3225_25.0000MF20X-W 26,4 r90 top

## Footprints (in the part's own frame and the unit in brackets; to place one, negate y for a bottom-side part, rotate by r counter-clockwise, add the part's x,y. Pads: shape width x height; smd on the part's side, far side on the other; paste and mask are expansions set on the pad)
AP6212-12X12 [mm]
  rect 1.125x0.5 smd: 1(-5.687,4.5) 2(-5.687,3.6) 3(-5.687,2.7) 4(-5.687,1.8) 5(-5.687,0.9) 6(-5.687,0) 7(-5.687,-0.9) 8(-5.687,-1.8) 9(-5.687,-2.7) 10(-5.687,-3.6) 11(-5.687,-4.5) 23(5.687,-4.5) 24(5.687,-3.6) 25(5.687,-2.7) 26(5.687,-1.8) 27(5.687,-0.9) 28(5.687,0) 29(5.687,0.9) 30(5.687,1.8) 31(5.687,2.7) 32(5.687,3.6) 33(5.687,4.5)
  rect 0.5x1.125 smd: 12(-4.5,-5.687) 13(-3.6,-5.687) 14(-2.7,-5.687) 15(-1.8,-5.687) 16(-0.9,-5.687) 17(0,-5.687) 18(0.9,-5.687) 19(1.8,-5.687) 20(2.7,-5.687) 21(3.6,-5.687) 22(4.5,-5.687) 34(4.5,5.687) 35(3.6,5.687) 36(2.7,5.687) 37(1.8,5.687) 38(0.9,5.687) 39(0,5.687) 40(-0.9,5.687) 41(-1.8,5.687) 42(-2.7,5.687) 43(-3.6,5.687) 44(-4.5,5.687)
  round 0.6 smd: 45(-1.8,3.6) 46(0,3.6) 47(1.8,3.6)
  silkscreen extent -6.71,-6.5 6.5,6.5
CAPC1005X55X25LL05T10 [mm] "Chip Capacitor, 2-Leads, Body 1.00x0.50mm, IPC High Density"
  rect 0.56x0.52 smd: 1(-0.39,0) 2(0.39,0)
  body extent -0.53,-0.28 0.53,0.28, height 0.55
FP-DFE252010C-MFG [mm]
  rect 0.8x2 smd paste+0 mask+0: 1(-1,0) 2(1,0)
  silkscreen extent -0.23,-1.1 0.23,1.1, body extent -1.5,-1.2 1.5,1.2, height 0.25
FP-DM3AT-SF-PEJM5_40-MFG [mm]
  rect 0.7x1.2 smd paste+0 mask+0: 1(2.775,7.975) 2(1.675,7.975) 3(0.575,7.975) 4(-0.525,7.975) 5(-1.625,7.975) 7(-3.825,7.975) 8(-4.925,7.975) 9(-5.875,7.975)
  Keep-Out Layer region: 2.671,-8.076 5.221,-8.076 5.221,-6.726 2.671,-6.726
  Keep-Out Layer region: -5.425,1.375 3.275,1.375 3.275,2.975 -5.425,2.975
  Keep-Out Layer region: -6.069,-5.925 -5.369,-5.925 -5.369,1.675 -6.069,1.675
  Keep-Out Layer region: -7.225,-0.78 -6.475,-0.78 -6.475,2.82 -7.225,2.82
  Keep-Out Layer region: -7.231,4.53 -6.481,4.53 -6.481,7.78 -7.231,7.78
  silkscreen extent -7.02,-8.18 7.02,8.9, body extent -7.42,-8.27 7.42,8.67, height 0.25
FP-EVQ-P2002M-MFG [mm]
  rect 1x1.45 smd paste+0 mask+0: 1(-0.85,2.575) 2(0.85,2.575) 3(-0.85,-2.575) 4(0.85,-2.575)
  silkscreen extent -1.8,-2.4 1.8,4, body extent -1.9,-3.4 1.9,3.4, height 0.25
FP-GRM15-0_1-IPC_B [mm]
  rect 0.615x0.572 smd paste+0 mask+0: 1(-0.429,0) 2(0.429,0)
  silkscreen extent -0.74,-0.69 0.74,0.69, body extent -0.89,-0.44 0.89,0.44, height 0.25
FP-GRM15-MFG [mm]
  rect 0.4x0.5 smd paste+0 mask+0: 1(-0.4,0) 2(0.4,0)
  silkscreen extent -0.53,-0.63 0.53,0.63, body extent -0.7,-0.38 0.7,0.38, height 0.25
FP-GRM21B-0_15-MFG [mm]
  rect 0.7x1.3 smd paste+0 mask+0: 1(-0.95,0) 2(0.95,0)
  silkscreen extent -0.23,-0.7 0.23,0.7, body extent -1.4,-0.8 1.4,0.8, height 0.25
FP-GRM155-0_15-MFG [mm]
  rect 0.45x0.6 smd paste+0 mask+0: 1(-0.475,0) 2(0.475,0)
  silkscreen extent -0.58,-0.73 0.58,0.72, body extent -0.8,-0.43 0.8,0.43, height 0.25
FP-GRM188-0_2-IPC_C [mm]
  rect 0.905x0.906 smd paste+0 mask+0: 1(-0.601,0) 2(0.601,0)
  silkscreen extent -1.05,-0.9 1.05,0.9, body extent -1.15,-0.6 1.15,0.6, height 0.25
FP-GRM188-0_15-IPC_B [mm]
  rect 1.056x0.958 smd paste+0 mask+0: 1(-0.701,0) 2(0.701,0)
  silkscreen extent -1.23,-0.88 1.23,0.88
FP-RC0402-0_4-IPC_A [mm]
  rect 0.715x0.672 smd: 1(-0.479,0) 2(0.479,0)
  silkscreen extent -0.84,-0.74 0.84,0.74, body extent -1.04,-0.54 1.04,0.54, height 0.25
FP-RC0402-0_4-MFG [mm]
  rect 0.5x0.6 smd paste+0 mask+0: 1(-0.5,0) 2(0.5,0)
  silkscreen extent -0.5,-0.67 0.5,0.67, body extent -0.85,-0.4 0.85,0.4, height 0.25
FP-RC_L0402-IPC_A [mm]
  rect 0.715x0.672 smd paste+0 mask+0: 1(-0.479,0) 2(0.479,0)
  silkscreen extent -0.84,-0.74 0.84,0.74
GCT_USB4085-GF-A_REVA4 [mm]
  round 0.65 hole 0.4: A1(-2.975,4.36) A4(-2.125,4.36) A5(-1.275,4.36) A6(-0.425,4.36) A7(0.425,4.36) A8(1.275,4.36) A9(2.125,4.36) A12(2.975,4.36) B1(2.975,3.01) B4(2.125,3.01) B5(1.275,3.01) B6(0.425,3.01) B7(-0.425,3.01) B8(-1.275,3.01) B9(-2.125,3.01) B12(-2.975,3.01)
  oval 0.9x1.7 hole 0.6 slot 1.4 at 90 deg: S1(-4.325,0) S2(4.325,0)
  oval 0.9x2.4 hole 0.6 slot 2.1 at 90 deg: S3(-4.325,3.38) S4(4.325,3.38)
  silkscreen extent -4.47,-1.74 4.47,5.8, body extent -4.47,-4.25 4.47,4.92, height 3.46
HDR1X4 [mm] "Connector; Header; 4 Position"
  rect 1.5x1.5 hole 0.9: 1(0,0)
  round 1.5 hole 0.9: 2(2.54,0) 3(5.08,0) 4(7.62,0)
  silkscreen extent -1.27,-1.27 8.89,1.27
HDR1X9 [mm] "Connector; Header; 9 Position"
  rect 1.5x1.5 hole 0.9: 1(0,0)
  round 1.5 hole 0.9: 2(2.54,0) 3(5.08,0) 4(7.62,0) 5(10.16,0) 6(12.7,0) 7(15.24,0) 8(17.78,0) 9(20.32,0)
  silkscreen extent -1.27,-1.27 21.59,1.27
HDR1X10 [mm] "Connector; Header; 10 Position"
  rect 1.5x1.5 hole 0.9: 1(0,0)
  round 1.5 hole 0.9: 2(2.54,0) 3(5.08,0) 4(7.62,0) 5(10.16,0) 6(12.7,0) 7(15.24,0) 8(17.78,0) 9(20.32,0) 10(22.86,0)
  silkscreen extent -1.27,-1.27 24.13,1.27
HRS-U.FL-R-SMT-3_V [mm] "SMT, 3-Leads, Body 2.6x2.6mm"
  rect 1.05x2.2 smd: 1(-1.475,0) 2(1.475,0)
  rect 1x1.05 smd: 3(0,-1.525)
  silkscreen extent -2.67,-0.12 0.55,1.3, body extent -1.3,-1.3 1.3,1.3, height 1.25
INDC1608X95N [mm]
  rrect30% 0.9x0.97 smd: 1(-0.785,0) 2(0.785,0)
  silkscreen extent -0.8,-0.66 0.8,0.66, body extent -0.8,-0.4 0.8,0.4, height 0.95
JST-B2B-PH-K-S_V [mm] "Connector, 2-Leads, Body 5.9x4.5mm, Pitch 2mm"
  rect 1.5x1.5 hole 1: 1(-1,0.55)
  round 1.5 hole 1: 2(1,0.55)
  silkscreen extent -2.95,-2.25 2.95,2.25, body extent -2.95,-2.25 2.95,2.25, height 6
LED_KP-1608SGC [mm]
  rect 0.8x0.8 smd paste+0 mask+0.102: A(0.825,0) C(-0.825,0)
  silkscreen extent -2.32,-0.1 -2.13,0.1, body extent -0.8,-0.4 0.8,0.4, height 1.1
MIC_INMP441ACEZ-R7 [mm]
  rect 0.4x0.6 smd paste-0.025: 1(1.87,1.33) 2(0.82,1.33) 3(-0.23,1.33) 7(-0.23,-1.33) 8(0.82,-1.33)
  round 0.6 hole 0.6 unplated mask+0.505: ""(-1.29,0)
  silkscreen extent -2.36,-1.88 2.36,2.5, body extent -2.36,-1.88 2.36,1.88, height 1.05
QFN50P300X300X80-17N [mm]
  rrect25% 0.84x0.27 smd: 1(-1.435,0.75) 2(-1.435,0.25) 3(-1.435,-0.25) 4(-1.435,-0.75) 9(1.435,-0.75) 10(1.435,-0.25) 11(1.435,0.25) 12(1.435,0.75)
  rrect25% 0.27x0.84 smd: 5(-0.75,-1.435) 6(-0.25,-1.435) 7(0.25,-1.435) 8(0.75,-1.435) 13(0.75,1.435) 14(0.25,1.435) 15(-0.25,1.435) 16(-0.75,1.435)
  rect 1.1x1.1 smd paste-0.2: 17(0,0)
  silkscreen extent -2.57,-1.5 1.5,1.5, body extent -1.5,-1.5 1.5,1.5, height 0.9
QFN88-9x9-0.35 [mm] "QFN, 88-Leads, Body 9.00x9.00mm, Pitch 0.35mm, Thermal Pad 6.00x6.00mm, IPC Medium Density"
  rect 0.75x0.2 smd: 1(-4.475,3.675) 2(-4.475,3.325) 3(-4.475,2.975) 4(-4.475,2.625) 5(-4.475,2.275) 6(-4.475,1.925) 7(-4.475,1.575) 8(-4.475,1.225) 9(-4.475,0.875) 10(-4.475,0.525) 11(-4.475,0.175) 12(-4.475,-0.175) 13(-4.475,-0.525) 14(-4.475,-0.875) 15(-4.475,-1.225) 16(-4.475,-1.575) 17(-4.475,-1.925) 18(-4.475,-2.275) 19(-4.475,-2.625) 20(-4.475,-2.975) 21(-4.475,-3.325) 22(-4.475,-3.675) 45(4.475,-3.675) 46(4.475,-3.325) 47(4.475,-2.975) 48(4.475,-2.625) 49(4.475,-2.275) 50(4.475,-1.925) 51(4.475,-1.575) 52(4.475,-1.225) 53(4.475,-0.875) 54(4.475,-0.525) 55(4.475,-0.175) 56(4.475,0.175) 57(4.475,0.525) 58(4.475,0.875) 59(4.475,1.225) 60(4.475,1.575) 61(4.475,1.925) 62(4.475,2.275) 63(4.475,2.625) 64(4.475,2.975) 65(4.475,3.325) 66(4.475,3.675)
  rect 0.2x0.75 smd: 23(-3.675,-4.475) 24(-3.325,-4.475) 25(-2.975,-4.475) 26(-2.625,-4.475) 27(-2.275,-4.475) 28(-1.925,-4.475) 29(-1.575,-4.475) 30(-1.225,-4.475) 31(-0.875,-4.475) 32(-0.525,-4.475) 33(-0.175,-4.475) 34(0.175,-4.475) 35(0.525,-4.475) 36(0.875,-4.475) 37(1.225,-4.475) 38(1.575,-4.475) 39(1.925,-4.475) 40(2.275,-4.475) 41(2.625,-4.475) 42(2.975,-4.475) 43(3.325,-4.475) 44(3.675,-4.475) 67(3.675,4.475) 68(3.325,4.475) 69(2.975,4.475) 70(2.625,4.475) 71(2.275,4.475) 72(1.925,4.475) 73(1.575,4.475) 74(1.225,4.475) 75(0.875,4.475) 76(0.525,4.475) 77(0.175,4.475) 78(-0.175,4.475) 79(-0.525,4.475) 80(-0.875,4.475) 81(-1.225,4.475) 82(-1.575,4.475) 83(-1.925,4.475) 84(-2.275,4.475) 85(-2.625,4.475) 86(-2.975,4.475) 87(-3.325,4.475) 88(-3.675,4.475)
  rect 6x6 smd: 89(0,0)
  silkscreen extent -5.47,-4.7 4.7,4.7, body extent -4.55,-4.55 4.55,4.55, height 0.9
RESC1005X40X25ML05T10 [mm] "Chip Resistor, 2-Leads, Body 1.00x0.50mm, IPC Low Density"
  rect 0.7x0.65 smd: 1(-0.475,0) 2(0.475,0)
  body extent -0.53,-0.27 0.53,0.28, height 0.4
SOIC127P790X216-8N [mm]
  rrect25% 1.61x0.58 smd: 1(-3.605,1.905) 2(-3.605,0.635) 3(-3.605,-0.635) 4(-3.605,-1.905) 5(3.605,-1.905) 6(3.605,-0.635) 7(3.605,0.635) 8(3.605,1.905)
  silkscreen extent -4.9,-2.64 2.64,2.64, body extent -3.95,-2.64 3.95,2.64, height 2.16
SOT23-5 [mm] "SOT23, 5-Leads, Body 2.95x2.80mm, Pitch 0.95mm, IPC Medium Density"
  rect 1x0.6 smd: 1(-1.35,0.95) 2(-1.35,0) 3(-1.35,-0.95) 4(1.35,-0.95) 5(1.35,0.95)
  silkscreen extent -1.47,-1.55 0.45,1.92, body extent -1.48,-1.53 1.48,1.53, height 1.25
SOT95P280X145-6N [mm]
  rrect25% 1.21x0.59 smd: 1(-1.255,0.95) 2(-1.255,0) 3(-1.255,-0.95) 4(1.255,-0.95) 5(1.255,0) 6(1.255,0.95)
  silkscreen extent -2.65,-1.57 0.81,1.57, body extent -1.4,-1.46 1.4,1.46, height 0.4
TP-1.5MM [mm]
  round 1.5 smd: 1(0,0)
  silkscreen extent -1.1,-1.1 1.1,1.1
XTAL_TSX-3225_25.0000MF20X-W [mm]
  rect 1.15x1.4 smd: 1(-0.8,1.1) 2(-0.8,-1.1) 3(0.8,-1.1) 4(0.8,1.1)
  silkscreen extent -2.22,-0.08 1.25,1.2

## Part data
C1 C6 C7 C11 C12 C18 C22 C24 C26 C29 C30 C31 C32 C35 C36 C38 C43 C44 C53 C57 C61 C62: library part CMP-2100-03641-2, "CAP CER 0.1UF 16V X7R 0402", Capacitance=0.10μF, Manufacturer=Murata, Manufacturer Part Number=GRM155R71C104KA88D, Package=GRM15, Temperature="-55°C to +125°C", Temperature Characteristic=X7R, Temperature Range High=+125°C, Temperature Range Low=-55°C, Tolerance=10%, Voltage Rating=16Vdc, Category=Cap, ComponentLink2Description=Datasheet, ComponentLink2URL=https://search.murata.co.jp/Ceramy/image/img/A01X/G101/ENG/GRM155R71H471KA01-01A.pdf, Device Class L1="Passive Components", Device Class L2=Capacitors, Device Class L3="Ceramic Capacitors", Digikey Description="CAP CER 0.1UF 16V X7R 0402", Height=0.55mm, Ipc Land Pattern Name=CAPC10050X219, Lead Free=yes, Material=Ceramic, Mouser Description="0402 0.1 uF 16V ±10 % Tolerance X7R SMT Multilayer Ceramic Capacitor", Octopart=https://octopart.com/grm155r71c104ka88d-murata-196880, RoHS=TRUE, Standoff Height=0mm
C2 C3 C5 C13 C17 C50 C51 C59: library part CMP-2008-04556-2, "CAP CER 1UF 10V X5R 0402", Manufacturer=Murata, Manufacturer Part Number=GRM155R61A105KE15D, Package=GRM15-0.1, Temperature="-55°C to +85°C", Temperature Characteristic=X5R, Temperature Coefficient=15%, Temperature Range High=+85°C, Temperature Range Low=-55°C, Tolerance=10%, Voltage Rating=10V, Automotive=No, Capacitance=1uF, Category=Cap, ComponentLink2Description=Datasheet, ComponentLink2URL=https://search.murata.co.jp/Ceramy/image/img/A01X/G101/ENG/GRM155R61A105KE15-01A.pdf, Device Class L1="Passive Components", Device Class L2=Capacitors, Device Class L3="Ceramic Capacitors", Digikey Description="CAP CER 1UF 10V X5R 0402", Height=0.55mm, Ipc Land Pattern Name=CAPC10050X50, Lead Free=Yes, Material=Ceramic, Mouser Description="0402 1 uF 10 V ±10% Tolerance X5R Surface Mount Multilayer Ceramic Capacitor", Octopart=https://octopart.com/grm155r61a105ke15d-murata-197442, RoHS=TRUE
C4 C8 C14 C15 C52: library part CMP-06035-003573-1, "Chip Multilayer Ceramic Capacitors for General Purpose, 0402, 4.7uF, X5R, 15%, 20%, 10V", Case Code (Imperial)=0402, Case Code (Metric)=1005, Max Operating Temperature=85°C, Min Operating Temperature=-55°C, Tolerance=20%, Voltage Rating=10V, Capacitance=4.7uF, Case/Package=0402, Mount="Surface Mount", Packaging="Tape and Reel"
C9 C10 C16 C20 C21 C28 C33 C34 C37 C40 C42 C58 C60: library part CMP-06035-003612-1, "Chip Multilayer Ceramic Capacitors for General Purpose, 0603, 10uF, X5R, 15%, 20%, 10V", Case Code (Imperial)=0603, Case Code (Metric)=1608, Dielectric=X5R, Max Operating Temperature=85°C, Min Operating Temperature=-55°C, Package Quantity=4000, Tolerance=20%, Voltage Rating=10V, Capacitance=10uF, Case/Package=0603, Depth=0.8mm, Height=0.8mm, Lead Free="Lead Free", Length=1.6mm, Material=Ceramic, Mount="Surface Mount", Packaging="Tape and Reel", Termination=SMD/SMT, Thickness=0.035inch, Voltage Rating (DC)=10V, Weight=0.000222oz, Width=0.8mm
C41 C45 C47 C54: library part CMP-2000-06340-2, "Chip Multilayer Ceramic Capacitors for General Purpose, 0805, 22uF, X5R, 15%, 20%, 10V", Case Code (Imperial)=0805, Case Code (Metric)=2012, Dielectric=X5R, Max Operating Temperature=85°C, Min Operating Temperature=-55°C, Package Quantity=3000, Tolerance=20%, Voltage Rating=10V, Capacitance=22uF, Case/Package=0805, Depth=1.25mm, Height=1.25mm, Lead Free="Lead Free", Length=2mm, Mount="Surface Mount", Packaging="Tape and Reel", Radiation Hardening=No, REACH SVHC="No SVHC", Termination=SMD/SMT, Thickness=0.055inch, Voltage Rating (DC)=10V, Weight=0.000335oz, Width=0.049inch
C46 C48 C49: library part CMP-2000-06337-3, "Chip Multilayer Ceramic Capacitors for General Purpose, 0603, 22uF, X5R, 15%, 20%, 10V", Case Code (Imperial)=0603, Case Code (Metric)=1608, Dielectric=X5R, Max Operating Temperature=85°C, Min Operating Temperature=-55°C, Package Quantity=4000, Tolerance=20%, Voltage Rating=10V, Capacitance=22uF, Case/Package=0603, Depth=0.8mm, Height=0.8mm, Lead Free="Lead Free", Length=1.6mm, Material=Ceramic, Mount="Surface Mount", Packaging="Tape and Reel", REACH SVHC="No SVHC", Termination=SMD/SMT, Thickness=0.039inch, Voltage Rating (DC)=10V, Weight=0.000222oz, Width=0.8mm
C55 C56: library part CMP-2008-03918-1, Manufacturer=Murata, Part Number=GRM1555C1H180JA01D
D1: "17V Clamp 5A (8/20Âµs) Ipp Tvs Diode Surface Mount SOT-23-6", Package="SOT-23-6 STMicroelectronics", Availability="In Stock", Check_prices=https://www.snapeda.com/parts/USBLC6-2SC6/STMicroelectronics/view-part/?ref=eda, MF=STMicroelectronics, MP=USBLC6-2SC6, Price=None, Purchase-URL=https://pricing.snapeda.com/search/part/USBLC6-2SC6/?ref=eda, SnapEDA_Link=https://www.snapeda.com/parts/USBLC6-2SC6/STMicroelectronics/view-part/?ref=snap
E1: library part CMP-2000-05153-1, "Ultra Small Coaxial Connector, 6 GHz, -40 to 90 degC, 3-Pin SMD, RoHS, Bulk", Dielectric Material=LiquidCrystalPolymer(LCP), Frequency - Max=6GHz, Housing Color=Silver, Manufacturer="Hirose Electric", Operating Temperature=-40degC~90degC, Package Description="3-Pin Surface Mount Device, Body 2.6 x 2.6 mm", Package Reference=U.FL-R-SMT, Standard Package=100, Body Finish=Silver, Body Material=PhosphorBronze, Category=Connectors,Interconnects, Center Contact Material=PhosphorBronze, Center Contact Plating=Gold, Connector Style=U.FL, Connector Type=Jack,MalePin, Contact Termination=Solder, Datasheet URL=https://datasheet.ciiva.com/26945/getdatasheetpartid-475239-26945414.pdf, Datasheet Version=Feb-09, Dynamic Catalog=U.FLSeries, Family=CoaxialConnectors(RF), Fastening Type=Snap-On, Featured Product=HiroseU.FLSeries, Impedance=50Ohm, Manufacturer URL=https://www.hirose.com, Minimum Quantity=UltraMiniatureCoaxial, Mounting Type=SurfaceMount, Online Catalog=U.FLSeries, Other Names="H122041 / U.FL-R-SMT-1(01)-ND", Packaging=Bulk, Quantity Available=Bulk, Series=U.FL, Shield Termination=Solder, Unit PriceUSD=U.FL
FB2 FB5: library part MPZ1608S601ATA00, "600 Ohms @ 100 MHz 1 Power Line Ferrite Bead 0603 (1608 Metric) 1A 150mOhm", Package="0603 TDK", Check_prices=https://www.snapeda.com/parts/MPZ1608S601ATA00/TDK/view-part/?ref=eda, MF=TDK, MP=MPZ1608S601ATA00, SnapEDA_Link=https://www.snapeda.com/parts/MPZ1608S601ATA00/TDK/view-part/?ref=snap
J2: "USB-C (USB TYPE-C) USB 2.0 Receptacle Connector 24 (16+8 Dummy) Position Through Hole, Right Angle, low cost, 3.46mm profile, 16 pin, horizontal, Top mount", Package=None, Availability="In Stock", Check_prices=https://www.snapeda.com/parts/USB4085-GF-A/Global+Connector+Technology/view-part/?ref=eda, MF="Global Connector Technology", MP=USB4085-GF-A, Price=None, Purchase-URL=https://pricing.snapeda.com/search/part/USB4085-GF-A/?ref=eda, SnapEDA_Link=https://www.snapeda.com/parts/USB4085-GF-A/Global+Connector+Technology/view-part/?ref=snap
J3: "Header, 4-Pin", LatestRevisionDate=17-Jul-2002, LatestRevisionNote="Re-released for DXP Platform.", Publisher="Altium Limited"
J4: "Header, 9-Pin", LatestRevisionDate=17-Jul-2002, LatestRevisionNote="Re-released for DXP Platform.", Publisher="Altium Limited"
J5A J5B: "Header, 10-Pin", LatestRevisionDate=17-Jul-2002, LatestRevisionNote="Re-released for DXP Platform.", Publisher="Altium Limited"
J6: library part CMP-2000-05162-1, "Male Header, Pitch 2 mm, 1 x 2 Position, Height 6 mm, Tail Length 3.4 mm, -25 to 85 degC, RoHS, Bulk", Manufacturer=JST, Datasheet URL=http://datasheet.octopart.com/B2B-PH-K-S%28LF%29%28SN%29-JST-datasheet-8324864.pdf, Datasheet Version=Nov-08, Manufacturer URL=http://www.jst.com/home2.html, No of Positions=2, Pitch=2mm, Style/Orientation=StraightHeader/Plug, Termination=Crimp, Type=ShroudedHeader
L1 L2 L3: library part Inductor, "Inductor", Code_IEC=1005, Code_JEITA=0402, LatestRevisionDate=29-May-2009, LatestRevisionNote="IPC-7351 Footprint Added.", PackageDescription="Chip Inductor", PackageReference=0402-A, Published=8-Jun-2000, Publisher="Altium Limited"
L4: library part CMP-06042-014898-1, "Shielded Wirewound Inductor 4.7uH  1100mA 0.27Ω 1008 (2520)", Case Code (Imperial)=1008, Case Code (Metric)=2520, Current Rating=1.7A, DC Resistance (DCR)=270mR, Max DC Current=1.1A, Max Operating Temperature=125°C, Min Operating Temperature=-40°C, Resistor Type=Wirewound, Test Frequency=1MHz, Tolerance=20%, Case/Package=1008, Core Material=Ferrite, Depth=2mm, Height - Seated (Max)=0.039inch, Inductance=4.7uH, Length=0.098inch, Mount="Surface Mount", Packaging="Tape and Reel", Shielding=Shielded, Width=0.079inch
LED1 LED2: "KP-1608SGC Green LED, 568 nm 1608 (0603), Rectangle Lens SMD package", Package="0603 Kingbright", Check_prices=https://www.snapeda.com/parts/KP-1608SGC/Kingbright/view-part/?ref=eda, MF=Kingbright, MP=KP-1608SGC, SnapEDA_Link=https://www.snapeda.com/parts/KP-1608SGC/Kingbright/view-part/?ref=snap
R1 R8 R18 R58 R59: library part CMP-2002-07520-2, Case Code (Imperial)=0402, Max Operating Temperature=155°C, Min Operating Temperature=-55°C, Power Rating=63mW, Resistance=22Ω, Temperature Coefficient=100ppm/°C, Tolerance=1%, Voltage Rating=50V, Case/Package=0402, Composition="Thick Film", Depth=500µm, Height=400µm, Lead Free="Lead Free", Length=1mm, Military Standard=Not, Number of Pins=2, Packaging="Tape & Reel", REACH SVHC=Unknown, RoHS=Compliant, Schedule B="8533210045, 8533210045|8533210045|8533210045|8533210045|8533210045|8533210045|8533210045|8533210045, 8533210045|8533210045|8533210045|8533210045|8533210045|8533210045|8533210045|8533210045|8533210045, 8533210045|8533210045|8533210045|8533210045|8533210045|8533210045|8533210045|8533210045|8533210045|8533210045", Termination=SMD/SMT, Voltage Rating (AC)=50V, Voltage Rating (DC)=50V, Width=500µm
R2 R3 R4 R5 R6 R7 R17 R19 R20 R21 R22 R23 R24 R25 R52: library part CMP-2002-07353-1, Manufacturer="Yageo / Phycomp", Part Number=RC0402FR-0710KL
R9 R10 R11 R12 R13 R14 R15: library part CMP-1011-00586-2, Manufacturer="Yageo / Phycomp", Part Number=RC0402FR-074K7L
R16: library part CMP-2002-07602-1, Manufacturer="Yageo / Phycomp", Part Number=RC0402FR-0730KL
R37 R38: library part CMP-2002-07753-1, Manufacturer="Yageo / Phycomp", Part Number=RC0402FR-075K1L
R39 R40: library part CMP-2002-07068-1, Manufacturer="Yageo / Phycomp", Part Number=RC0402FR-075R1L
R41 R44 R56 R57: library part CMP-2002-07343-1, Manufacturer="Yageo / Phycomp", Part Number=RC0402FR-07100KL
R42: library part CMP-2002-07701-1, Manufacturer="Yageo / Phycomp", Part Number=RC0402FR-0747KL
R43: library part CMP-2002-07490-1, Manufacturer="Yageo / Phycomp", Part Number=RC0402FR-071ML
R45: library part CMP-2002-07516-1, Manufacturer=Yageo, Part Number=RC0402FR-0722K6L
R46: library part CMP-2002-07909-2, Case Code (Imperial)=0402, Case Code (Metric)=1005, Max Operating Temperature=155°C, Max Power Dissipation=63mW, Min Operating Temperature=-55°C, Resistance=11.8kΩ, Temperature Coefficient=100ppm/°C, Tolerance=1%, Voltage Rating=50V, Case/Package=0402, Composition="Thick Film", Contact Plating="Lead, Tin", Depth=500µm, Features="Moisture Resistant", Height=400µm, Lead Free="Lead Free", Length=1mm, Military Standard=Not, NexarPartId=9293467, Number of Terminations=2, Packaging="Tape & Reel", Power Rating=63mW, Radiation Hardening=No, RoHS=Compliant, Schedule B="8533210045, 8533210045|8533210045, 8533210045|8533210045|8533210045, 8533210045|8533210045|8533210045|8533210045", Termination=SMD/SMT, Voltage Rating (DC)=50V, Weight=652.039032µg, Width=508µm
R47: library part CMP-2002-07501-2, Case Code (Imperial)=0402, Case Code (Metric)=1005, Max Operating Temperature=155°C, Max Power Dissipation=63mW, Min Operating Temperature=-55°C, Power Rating=62.5mW, Resistance=20kΩ, Temperature Coefficient=100ppm/°C, Tolerance=1%, Voltage Rating=50V, Case/Package=0402, Composition="Thick Film", Depth=500µm, Features="Moisture Resistant", Height=350µm, Lead Free="Lead Free", Length=1mm, Military Standard=Not, NexarPartId=39794396, Number of Pins=2, Number of Terminations=2, Packaging="Tape & Reel", REACH SVHC="No SVHC", RoHS=Compliant, Schedule B="8533210045, 8533210045|8533210045|8533210045|8533210045|8533210045|8533210045|8533210045|8533210045|8533210045|8533210045|8533210045|8533210045|8533210045|8533210045|8533210045|8533210045|8533210045|8533210045|8533210045|8533210045|8533210045|8533210045|8533210045|85", Termination=SMD/SMT, Voltage Rating (DC)=50V, Width=500µm
R48: library part CMP-2002-07410-1, Manufacturer="Yageo / Phycomp", Part Number=RC0402FR0715KL
R49: library part CMP-2002-07378-2, "RES SMD 12K OHM 1% 1/16W 0402", Case Code (Imperial)=0402, Case Code (Metric)=1005, Max Operating Temperature=155°C, Max Power Dissipation=63mW, Min Operating Temperature=-55°C, Package Quantity=1, Power Rating=62.5mW, Resistance=12kR, Resistance Tolerance=1%, Resistor Type="Thick Film", Temperature Coefficient=100ppm/°C, Voltage Rating=50V, Case/Package=0402, Construction=Rectangular, Depth=0.5mm, Features="Moisture Resistant", Height=0.016inch, Lead Free="Lead Free", Length=1mm, Military Standard=Not, Number of Terminations=2, Packaging="Tape and Reel", REACH SVHC="No SVHC", RoHS Compliant=Yes, Series=RC, Size Code=0402, Termination=SMD/SMT, Tolerance=1%, Weight=2.3E-05oz, Width=0.02inch
R50 R51: library part CMP-2002-07617-1, Manufacturer="Yageo / Phycomp", Part Number=RC0402FR-0733KL
R53: library part CMP-2002-07580-2, "RES SMD 2K OHM 1% 1/16W 0402", Manufacturer=Yageo, Manufacturer Part Number=RC0402FR-072KL, Package=RC_L0402, Power Rating=0.0625W, Resistance=2kΩ, Temperature="-55°C to +155°C", Temperature Coefficient=100ppm/°C, Temperature Range High=+155°C, Temperature Range Low=-55°C, Tolerance=1%, Voltage Rating=50V, Automotive=No, Category=Res, ComponentLink2Description=Datasheet, ComponentLink2URL=http://www.yageo.com/documents/recent/PYu-RC_Group_51_RoHS_L_9.pdf, Composition="Thick Film", Device Class L1="Passive Components", Device Class L2=Resistors, Device Class L3="Chip SMD Resistors", Digikey Description="RES SMD 2K OHM 1% 1/16W 0402", Footprint Url=https://www.yageo.com/upload/website/yageo_PYu-R_Mount_10_19050818_343.pdf, Height=0.4mm, Ipc Land Pattern Name=RESC10050X35, Lead Free=Yes, Mouser Description="RES SMD 2K OHM 1% 1/16W 0402", Octopart=https://octopart.com/rc0402fr-072kl-yageo-5032519, RoHS=TRUE, Series=RC_L, Standoff Height=0mm
R54: library part CMP-2002-07472-3, "RES 1K OHM 1% 1/16W 0402", Case Code (Imperial)=0402, Case Code (Metric)=1005, Max Operating Temperature=155°C, Max Power Dissipation=63mW, Min Operating Temperature=-55°C, Power Rating=62.5mW, Resistance=1kR, Resistance Tolerance=1%, Resistor Type="Thick Film", Temperature Coefficient=100ppm/°C, Voltage Rating=50V, Case/Package=0402, Construction=Rectangular, Depth=0.5mm, Features="Moisture Resistant", Height=0.32mm, Lead Free="Lead Free", Length=1mm, Military Standard=Not, Number of Pins=2, Number of Terminations=2, Packaging="Tape and Reel", Reach SVHC Compliant=Yes, RoHS Compliant=Yes, Series=RC, Size Code=0402, Technology="THICK FILM", Termination=SMD/SMT, Tolerance=1%, Voltage Rating (DC)=50V, Width=0.5mm
R55: library part CMP-2002-07008-1, Manufacturer="Yageo / Phycomp", Part Number=RC0402FR-07300KL
R60: library part CMP-1011-00001-2, Manufacturer="Yageo / Phycomp", Part Number=RC0402JR-070RL
SW1 SW2: library part CMP-00287-40010164-1, "EVQ-P2002M Switch Tactile N.O. SPST Button J-Bend 0.02A 15VDC 1N SMD Automotive Embossed T/R", Contact Current Rating=20mA, Contact Resistance=100mΩ, Max Operating Temperature=85°C, Max Voltage Rating (DC)=15V, Min Operating Temperature=-40°C, Operating Force=1N, Actuator Length=450µm, Current Rating=20mA, Electrical Life=1Mcycles, Height=2.3mm, Illumination Type="Illuminated, Non-Illuminated", Lead Free="Lead Free", Life (Cycles)=1Mcycles, Mechanical Life=1Mcycles, Mount="Surface Mount", NexarPartId=40010164, Number of Positions=2, Orientation=Straight, Radiation Hardening=No, REACH SVHC="No SVHC", RoHS=Compliant, Switch Function=Off-Mom, Switch Travel=250µm, Termination=J-Bend, Throw Configuration=SPST, Voltage Rating (DC)=15V
TP1 TP2 TP3 TP4 TP5 TP6 TP7 TP8: library part TestPoint, "Test point, 1.5 mm exposed pad"
U1: "RISC-V C906 / Cortex-A53 SoC, 256MB DDR3 SiP, QFN88 9x9 0.35mm"
U2: library part CMP-11597-000006-1, "CONN MICRO SD R/A PUSH-PUSH SMD", Color=Black, Contact Resistance=100mR, Current Rating=500mA, Flammability Rating="UL94 V-0", Insulation Resistance=1GR, Max Operating Temperature=85°C, Max Voltage Rating (AC)=125V, Min Operating Temperature=-25°C, Package Quantity=400, Connector Type=Connector, Contact Material="Copper Alloy", Contact Plating=Gold, Depth=15.95mm, Gender=Receptacle, Housing Material=Polymer, Lead Free="Lead Free", Length=13.85mm, Mating Cycles=10000, Max Current Rating=500mA, Mount="Surface Mount", Number of Contacts=8, Number of Rows=2, Orientation="Right Angle", Packaging="Tape and Reel", Pitch=1.1mm, Radiation Hardening=No, REACH SVHC="No SVHC", Series=DM3, Termination=Solder, Voltage Rating=125V, Voltage Rating (AC)=125V, Width=13.85mm
U3: "FLASH - NOR Memory IC 128Mb (16M x 8) SPI - Quad I/O, QPI, DTR 133 MHz 8-SOIC", Package="SOIC-8 Winbond Electronics", Check_prices=https://www.snapeda.com/parts/W25Q128JVSIM%20TR/Winbond/view-part/?ref=eda, MF="Winbond Electronics", MP="W25Q128JVSIM TR", SnapEDA_Link=https://www.snapeda.com/parts/W25Q128JVSIM%20TR/Winbond/view-part/?ref=snap
U5 U6 U7: library part ETA3414, "1.5A 3MHz synchronous step-down converter, SOT23-5"
U8: library part ETA5050V18, "1.8V fixed LDO, SOT23-5"
U9: "Tiny, Low-Cost, PCM Class D Amplifier with Class AB Performance", Package="TQFN-16 Maxim", Check_prices=https://www.snapeda.com/parts/MAX98357AETE+T/Analog+Devices/view-part/?ref=eda, MF="Analog Devices", MP=MAX98357AETE+T, SnapEDA_Link=https://www.snapeda.com/parts/MAX98357AETE+T/Analog+Devices/view-part/?ref=snap
U10: "60 Hz ~ 15 kHz Digital, I2S Microphone MEMS (Silicon) 1.62 V ~ 3.63 V Omnidirectional (-26dB Â±3dB @ 94dB SPL) Solder Pads", Package="LGA-9 TDK InvenSense", Check_prices=https://www.snapeda.com/parts/INMP441ACEZ-R7/TDK/view-part/?ref=eda, MF="TDK InvenSense", MP=INMP441ACEZ-R7, SnapEDA_Link=https://www.snapeda.com/parts/INMP441ACEZ-R7/TDK/view-part/?ref=snap
Y1: Package=None, Availability=Unavailable, MF="{'manufacturer': u'Epson Timing'}", MP="TSX-3225 25.0000MF20X-W", Price=None

## Via types
v1: diameter 0.6, hole 0.3, Top Layer to Bottom Layer, 211 vias

## Nets (pads, with @x,y where several pads share a name; then routed paths per layer and width w, separated by ;. In a path a pad name is that pad's centre, name@x,y a point inside that pad or via, vN(x,y) a via of type N, cw(c..) or ccw(c..) an arc to the next point about the centre after c; other vN are vias at no path point)
ADC1: J4.7 U1.59 | length 32.4
  Top Layer w0.2: U1.59@31.475,21.725 31.883,21.725 32.331,21.277 32.773,21.277 v1(32.85,21.2)
  Bottom Layer w0.2: J4.7@16.89,36 17.99,34.9 27.839,34.9 29.975,32.764 29.975,31.73 30.5,31.205 30.5,27.795 30.082,27.377 30.082,25.059 29.4,24.378 29.4,23.6 29.8,23.2 29.8,20.788 30.238,20.35 31.892,20.35 32.742,21.2 v1(32.85,21.2)
AMP_GAIN: R56.1 U9.2 | length 13.9
  Top Layer w0.2: U9.2@52.265,21.15 52.23,21.115 51.715,21.115 51.3,20.7 51.3,18.9 52.43,17.77 55.292,17.77 57.454,15.608 59.454,13.608 59.454,13.271 R56.1@59.625,13.1
AMP_SD_MODE: R55.1 U1.48 | length 27.8
  Top Layer w0.15: U1.48@31.475,17.875 32.681,17.875 32.906,18.1 v1(33.028,18.1)
  Top Layer w0.2: v1(34.478,15.018) 34.478,14.922 35.6,13.8 37.085,13.8 37.172,13.713 53.887,13.713 54.5,13.1 R55.1@56.025,13.1
  Bottom Layer w0.2: v1(33.028,18.1) 33.136,18.1 33.8,17.436 33.8,15.6 34.382,15.018 v1(34.478,15.018)
AUD_AVREF: C59.1 U1.3 | length 6.7
  Top Layer w0.2: v1(18.729,26.3) 19.537,26.3 21.061,24.776 21.061,24.493 v1(21.138,24.417) ; U1.3@22.525,23.475 23.225,23.475 v1@23.3,23.4
  Bottom Layer w0.2: v1(21.138,24.417) 22.154,23.4 v1@23.3,23.4
  other v1: 23.4,23.4
BOOT_BTN: SW2.2 U1.44 | length 22.4
  Top Layer w0.2: U1.44@30.675,16.025 30.675,15.588 30.792,15.471 31.129,15.471 v1(31.2,15.4)
  Bottom Layer w0.2: v1(20.575,1.65) 20.6,1.675 21.033,1.675 21.15,1.792 21.15,6.066 21.334,6.25 23.35,6.25 24.15,7.05 25.65,7.05 25.656,7.056 26.189,7.056 26.194,7.05 27.153,7.05 28.703,8.6 30.25,10.147 30.25,10.678 31.2,11.628 31.2,12.6 v1(31.2,15.4)
CC1: J2.A5 R37.2 | length 2.3
  Top Layer w0.2: R37.2@35,29.975 35,30.515 J2.A5@36.275,31.79
CC2: J2.B5 R38.2 | length 6.3
  Top Layer w0.2: R38.2@33.5,29.975 33.5,30.625 33.037,31.088 31.913,31.088 31.45,31.552 31.45,32.028 31.942,32.52 33.105,32.52 J2.B5@33.725,33.14
CPU_SEL: R15.1 U1.67 | length 6
  Top Layer w0.2: U1.67@30.675,24.975 30.992,24.975 31.849,25.833 v1(31.849,26.927) ; v1(31.064,28.764) 31.075,28.775 31.775,28.775 32,29 R15.1@32,29.025
  Bottom Layer w0.2: v1(31.064,28.764) 31.135,28.764 31.926,27.973 31.926,27.004 v1(31.849,26.927)